# Altium PCB RLC_PCB.PcbDoc
Units mm, origin at the board's own origin, x right, y up, seen from the top; angles counter-clockwise.
Board outline 80 x 55 mm, 2 copper layers (Top Layer, Bottom Layer); 26 components, 16 nets, 138 pads, 207 vias.
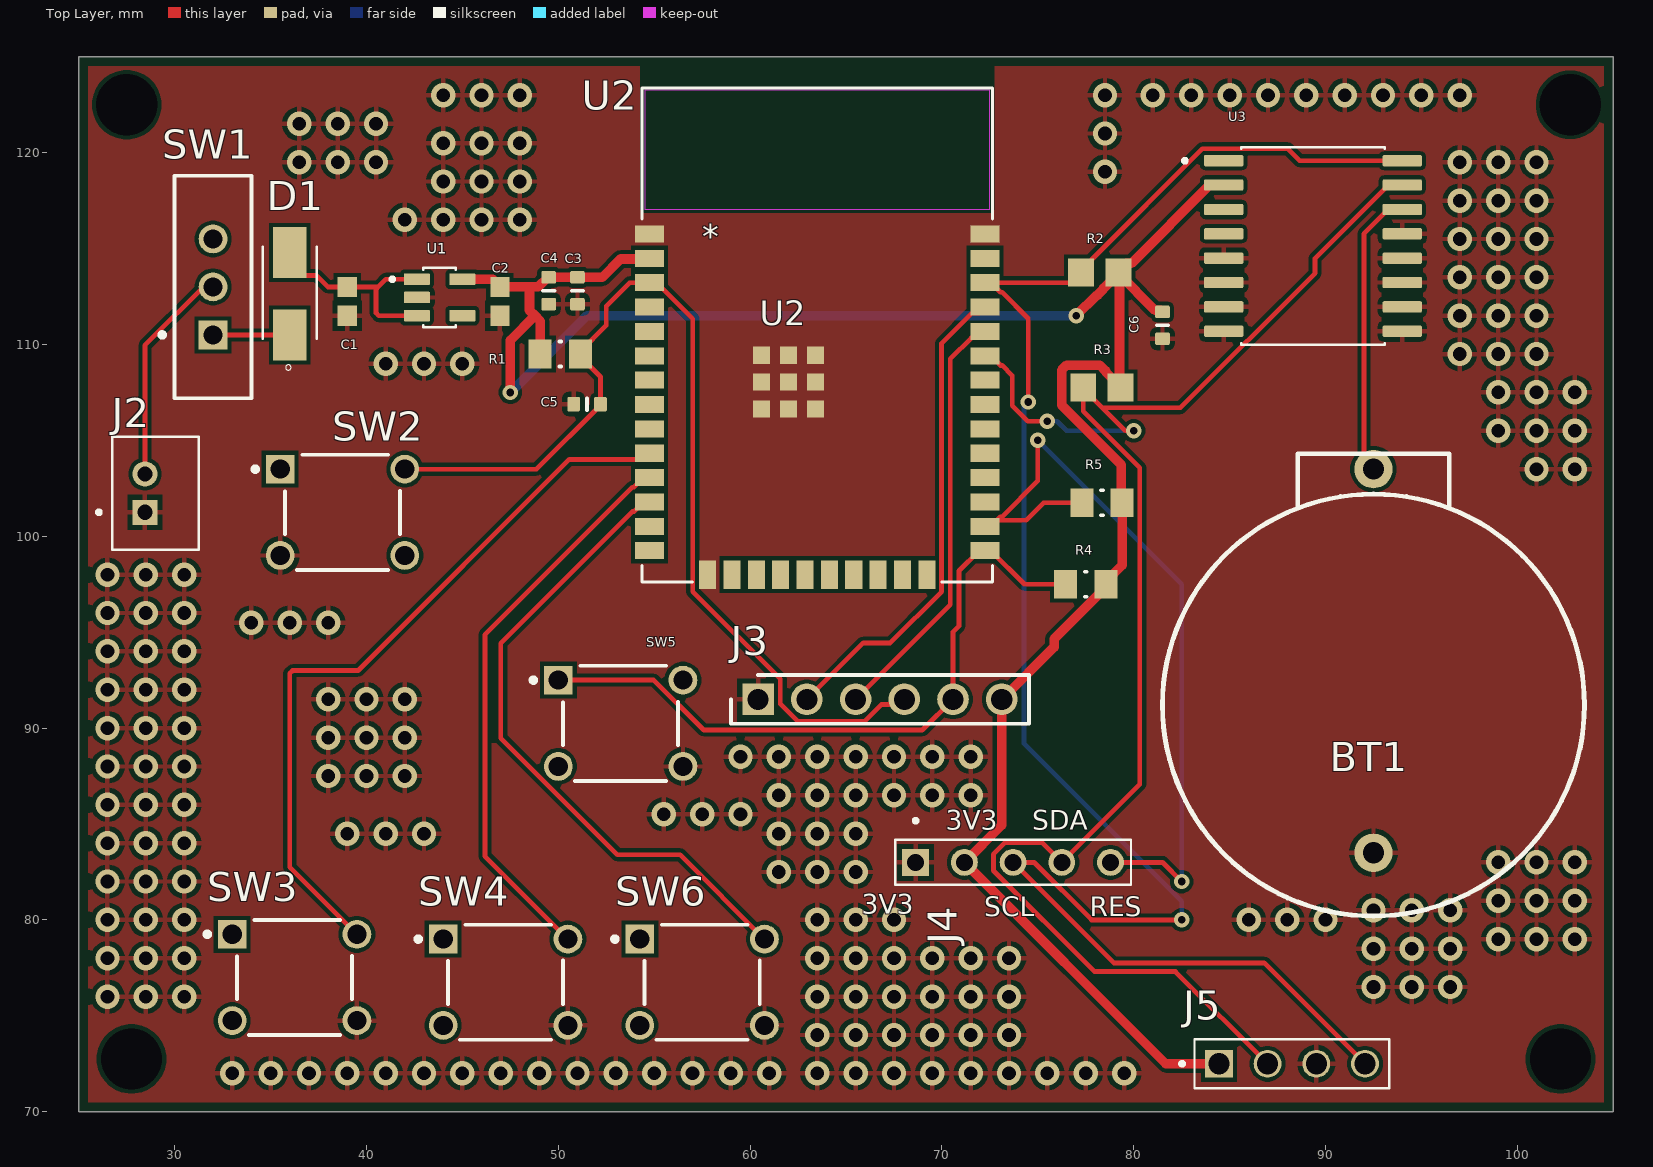
[diagram p0: Top Layer view]
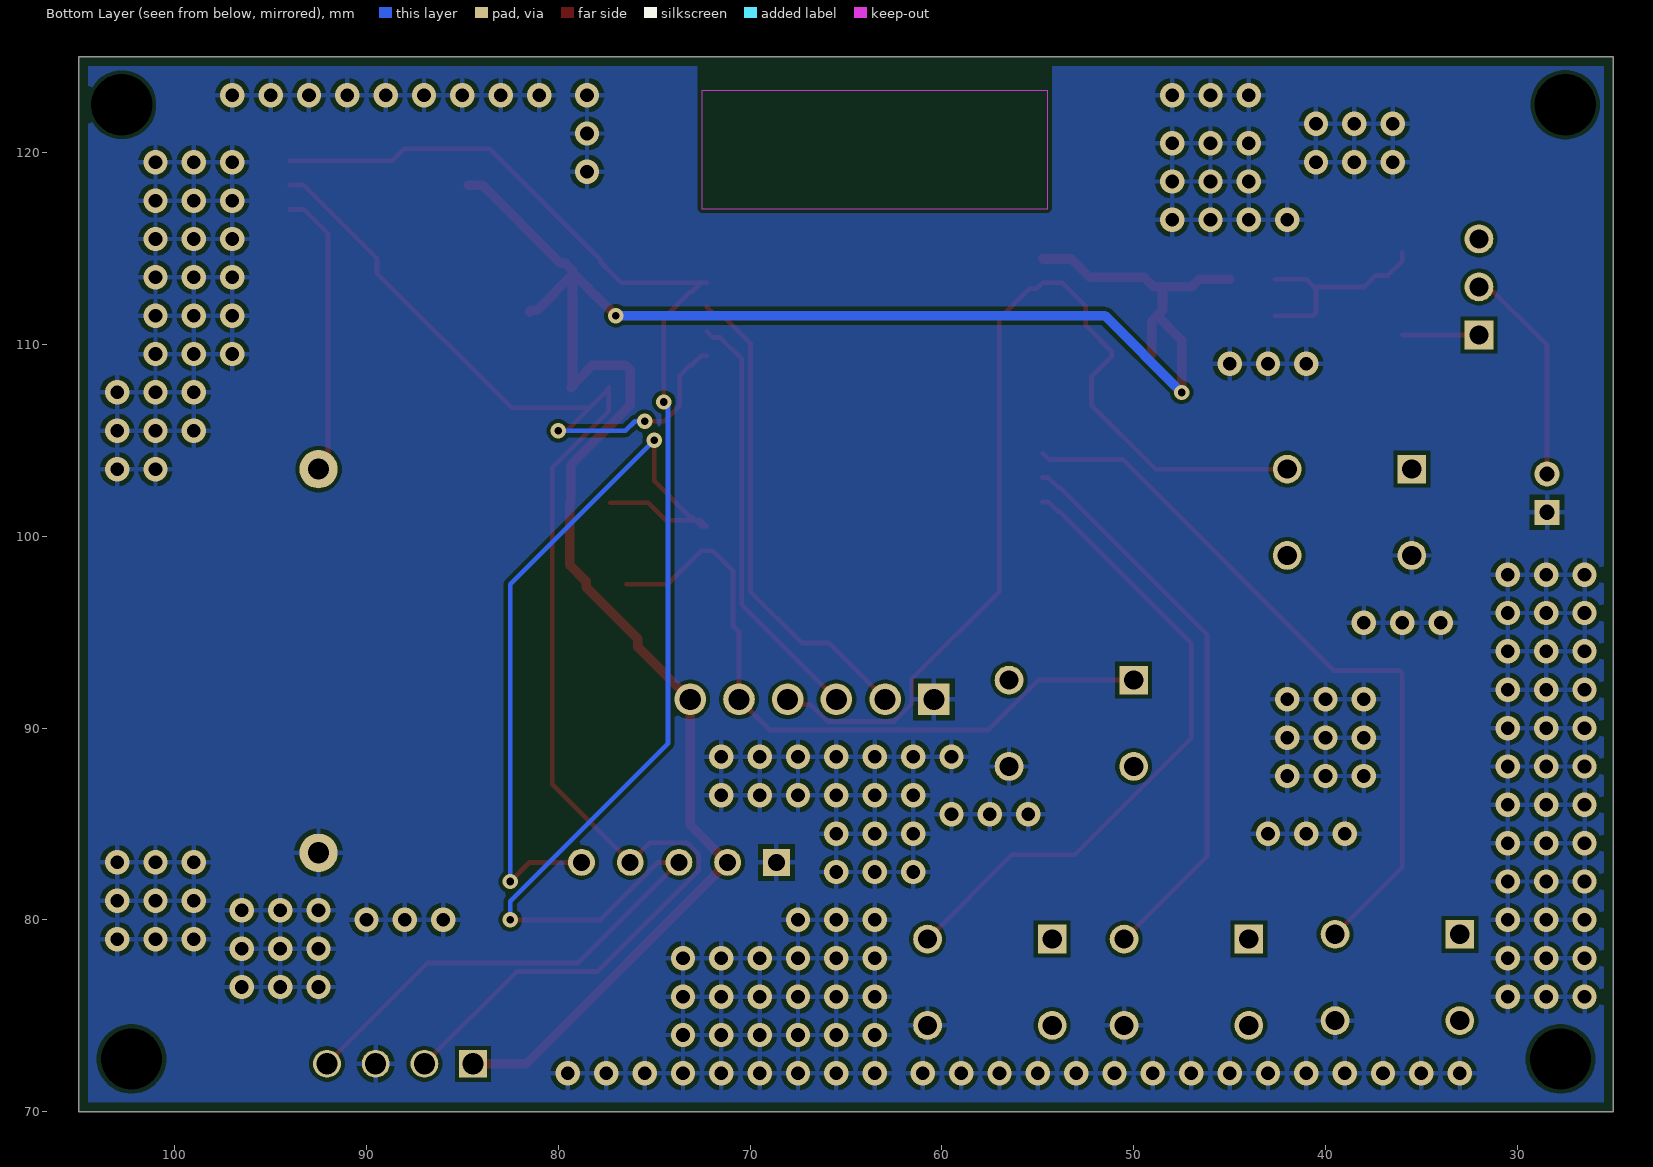
[diagram p1: Bottom Layer view, seen from below]
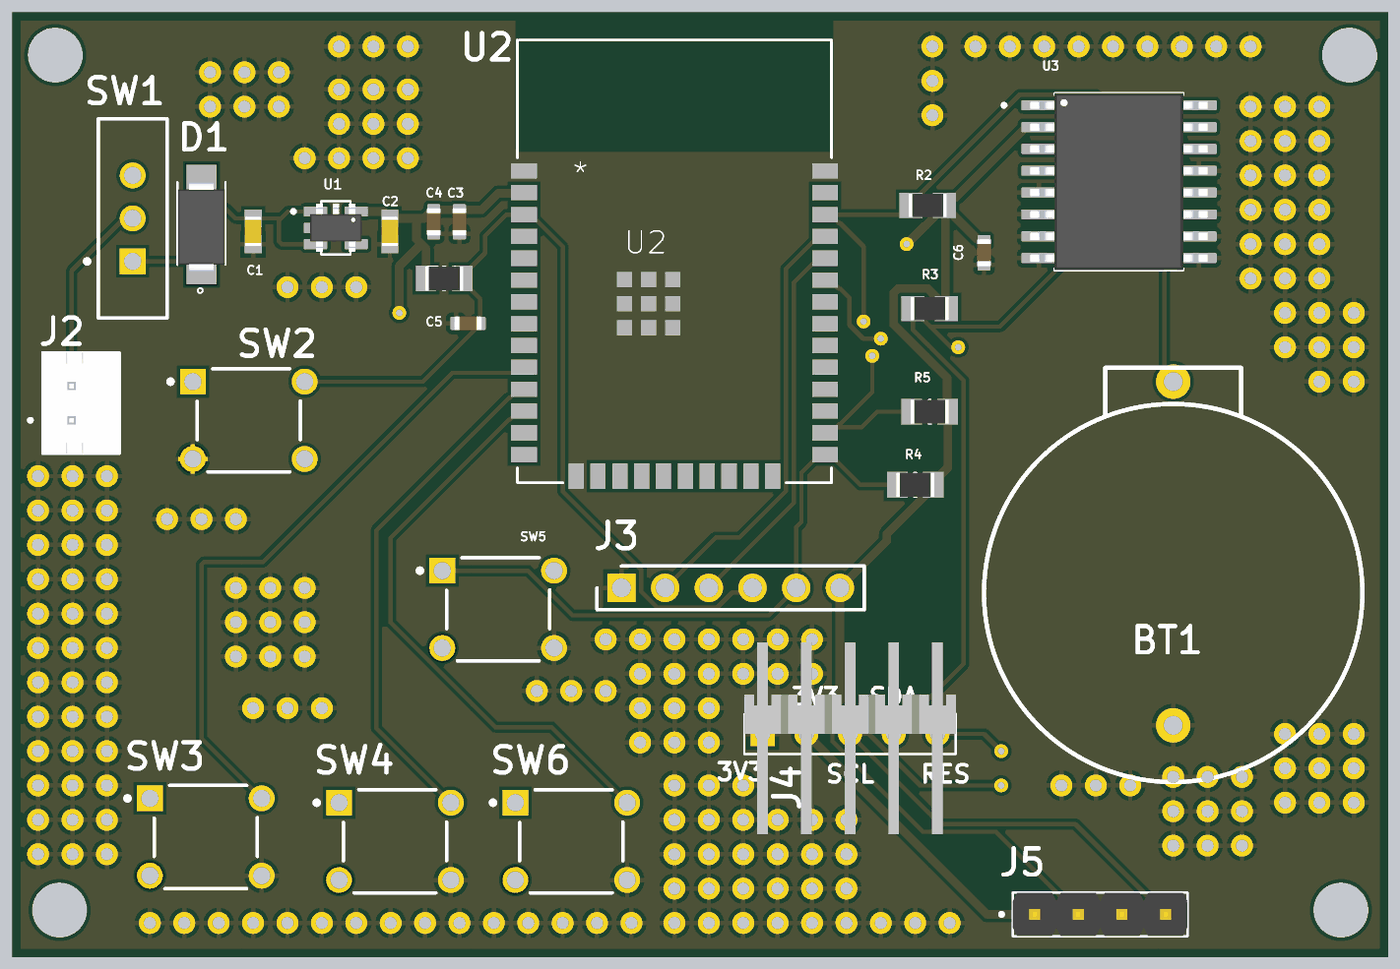
[diagram p2: 3D render of the assembled board from above, using the file's embedded part models]

## Layer stack, top to bottom
Top Solder: solder mask 0.0102, Solder Resist, Dk 3.5
Top Layer: signal copper 0.0356
Dielectric 1: dielectric 0.32, FR-4, Dk 4.8
Bottom Layer: signal copper 0.0356
Bottom Solder: solder mask 0.0102, Solder Resist, Dk 3.5

## Board outline
25,70 25,125 105,125 105,70

## Design rules (kind name [scope] priority, off if disabled: settings)
BoardOutlineClearance [All] p1: gap=0.4 ignorepadtopadclearanceinfootprint=FALSE
Clearance [All] p1: gap=0.2 ignorepadtopadclearanceinfootprint=FALSE
HoleSize [All] p1: absolutevalues=TRUE maxlimit=6 minlimit=0.3 maxpercent=80.000 minpercent=20.000
HoleToHoleClearance [All] p1: gap=0.5 allowstackedmicrovias=TRUE
MinimumAnnularRing [All] p1: minimumring=0.15
PolygonConnect Direct_U2 [InComponent('U2')] p1: thpad.connectstyle=Direct thpad.reliefconductorwidth=0.254 thpad.reliefentries=4 thpad.polygonreliefangle="90 Angle" thpad.airgapwidth=0.254 smdpad.connectstyle=Direct smdpad.reliefconductorwidth=0.254 smdpad.reliefentries=4 smdpad.polygonreliefangle="90 Angle" smdpad.airgapwidth=0.254 via.connectstyle=Relief via.reliefconductorwidth=0.254 via.reliefentries=4 via.polygonreliefangle="90 Angle" via.airgapwidth=0.254
PolygonConnect [All] p2: connectstyle=Relief reliefconductorwidth=0.254 reliefentries=4 polygonreliefangle="90 Angle" airgapwidth=0.254
RoutingVias [All] p1: holewidth=0.711 width=1.27 viastyle="Through Hole" minholewidth=0.3 minwidth=0.6 maxholewidth=0.4 maxwidth=0.8
SilkToSolderMaskClearance [IsPad] p1: minsilkscreentomaskgap=0.15 clearancetoexposedcopper=TRUE
SolderMaskExpansion [All] p1: expansion=0 istentingtop=FALSE
SupplyNets "Schematic Supply Nets" [InNet('GND')] p1: voltage=0.000
Width Width_Power [InNet('3V3')] p1: maxlimit=1 minlimit=0.4 preferedwidth=0.5
Width [All] p2: maxlimit=1 minlimit=0.2 preferedwidth=0.25
27 further rules are at their usual default settings.

## Components (designator, comment, footprint, x,y, rotation, side; value= is the part's Value field where it differs from the comment)
BT1 "2032" PCBCOMPONENT_1 92.5,93.5 r90 top
C1 "Capacitor 1 uF +/- 10% 16 V 0603" CAPC1608X94X35NL15T15 39,112.25 r270 top value=1µF
C2 "Capacitor 1 uF +/- 10% 16 V 0603" CAPC1608X94X35NL15T15 46.954,112.25 r270 top value=1µF
C3 "Capacitor 10µF +/-20% 10V 0603" CAPC0603(1608)100_L 51,112.8 r270 top value=10µF
C4 "Capacitor 100nF +/-20% 10V 0603" CAPC0603(1608)100_L 49.5,112.8 r270 top value=100nF
C5 "Capacitor 10µF +/-20% 10V 0603" CAPC0603(1608)100_L 51.5,106.891 r0 top value=1µF
C6 "Capacitor 10µF +/-20% 10V 0603" CAPC0603(1608)100_L 81.5,111 r90 top value=100nF
D1 "SS14" SMA 36,112.5 r90 top
J2 "B2B-PH-K-S" JST_B2B-PH-K-S 29,102.25 r270 top
J3 "PRPC006SAAN-RC" HDRV6W64P0X254_1X6_1524X254X834P 60.42,91.5 r0 top
J4 "5-146280-5" TE_5-146280-5 73.71,83 r0 top
J5 "header 4" WURTH_61300411121 88.25,72.5 r0 top
R1 "Resistor 10k +/-1% 0805 125 mW" RESC2013X50X35ML15T15 50.109,109.5 r0 top value=10k
R2 "Resistor 4k7 +/-1% 0805 125 mW" RESC2013X70X40ML20T20 78.225,113.75 r0 top value=4.7k
R3 "Resistor 4k7 +/-1% 0805 125 mW" RESC2013X70X40ML20T20 78.342,107.75 r0 top value=4.7k
R4 "Resistor 10k +/-1% 0805 125 mW" RESC2013X50X35ML15T15 77.5,97.5 r0 top value=10k
R5 "Resistor 10k +/-1% 0805 125 mW" RESC2013X50X35ML15T15 78.342,101.75 r180 top value=10k
SW1 "EG1218" ESWI-EG1218_V 32,113 r90 top
SW2 "B3F-1000" OMRON-B3F-1000-4_V 38.75,101.25 r0 top
SW3 "B3F-1000" OMRON-B3F-1000-4_V 36.25,77 r0 top
SW4 "B3F-1000" OMRON-B3F-1000-4_V 47.25,76.75 r0 top
SW5 "B3F-1000" OMRON-B3F-1000-4_V 53.25,90.25 r0 top
SW6 "B3F-1000" OMRON-B3F-1000-4_V 57.5,76.75 r0 top
U1 "AP2112K-3.3TRG1" SOT95P285X140-5N 43.815,112.45 r0 top
U2 "ESP32-WROOM-32E-N4" ESP32­WROOM­32E_EXP 63.5,110.5 r0 top
U3 "DS3231SN_" SOIC127P1032X265-16N 89.345,115.135 r0 top

## Footprints (in the part's own frame and the unit in brackets; to place one, negate y for a bottom-side part, rotate by r counter-clockwise, add the part's x,y. Pads: shape width x height; smd on the part's side, far side on the other; paste and mask are expansions set on the pad)
CAPC0603(1608)100_L [mm] "Chip Capacitor, Body 1.6x0.8mm, Height 1.0mm, IPC High Density"
  rrect25% 0.66x0.76 smd: 1(-0.7,0) 2(0.7,0)
  silkscreen extent 0,-0.3 0,0.3, body extent -0.8,-0.4 0.8,0.4, height 0.95
CAPC1608X94X35NL15T15 [mm] "Chip Capacitor, 2-Leads, Body 1.75x0.96mm, IPC Medium Density"
  rect 1.05x1 smd: 1(-0.75,0) 2(0.75,0)
  body extent -0.87,-0.48 0.87,0.48, height 0.94
ESP32­WROOM­32E_EXP [mil]
  rect 59x35 smd paste+0 mask+0: 1(-344.5,207.1) 2(-344.5,157.1) 3(-344.5,107.1) 4(-344.5,57.1) 5(-344.5,7.1) 6(-344.5,-42.9) 7(-344.5,-92.9) 8(-344.5,-142.9) 9(-344.5,-192.9) 10(-344.5,-242.9) 11(-344.5,-292.9) 12(-344.5,-342.9) 13(-344.5,-392.9) 14(-344.5,-442.9) 25(344.5,-442.9) 26(344.5,-392.9) 27(344.5,-342.9) 28(344.5,-292.9) 29(344.5,-242.9) 30(344.5,-192.9) 31(344.5,-142.9) 32(344.5,-92.9) 33(344.5,-42.9) 34(344.5,7.1) 35(344.5,57.1) 36(344.5,107.1) 37(344.5,157.1) 38(344.5,207.1)
  rect 35x59 smd paste+0 mask+0: 15(-225,-492.15) 16(-175,-492.15) 17(-125,-492.15) 18(-75,-492.15) 19(-25,-492.15) 20(25,-492.15) 21(75,-492.15) 22(125,-492.15) 23(175,-492.15) 24(225,-492.15)
  rect 35x35 smd paste+0 mask+0: 39(-59.1,-96.9) 40(-114.2,-41.8) 41(-114.2,-96.9) 42(-114.2,-152) 43(-59.1,-152) 44(-4,-152) 45(-4,-96.9) 46(-4,-41.8) 47(-59.1,-41.8)
  Keep-Out Layer region: 354.5,258 354.5,502 -354.5,502 -354.5,258
  silkscreen extent -360,-507 360,507
ESWI-EG1218_V [mm] "THD, 3-Leads, Body 11.6x4mm, Pitch 2.5mm"
  rect 1.5x1.5 hole 1: 1(-2.5,0)
  round 1.5 hole 1: 2(0,0) 3(2.5,0)
  silkscreen extent -5.8,-2 5.8,2.77, body extent -5.8,-2 5.8,2, height 7.4
HDRV6W64P0X254_1X6_1524X254X834P [mm]
  rect 1.65x1.65 / inner round 1.65 / far side rect 1.65x1.65 hole 1.1: 1(0,0)
  round 1.65 hole 1.1: 2(2.54,0) 3(5.08,0) 4(7.62,0) 5(10.16,0) 6(12.7,0)
  silkscreen extent -1.42,-1.27 14.12,1.27
JST_B2B-PH-K-S [mm]
  rect 1.308x1.308 / inner round 1.308 / far side rect 1.308x1.308 hole 0.8: 1(1,-0.55)
  round 1.308 hole 0.8: 2(-1,-0.55)
  silkscreen extent -2.95,-3.05 2.95,2.25, body extent -2.95,-2.25 2.95,2.25, height 6
OMRON-B3F-1000-4_V [mm] "TH, 4-Leads, Body 6x6mm"
  rect 1.5x1.5 hole 1 paste-2539.97: 1(-3.25,2.25)
  round 1.5 hole 1 paste-2539.97: 2(3.25,2.25) 4(3.25,-2.25)
  round 1.5 hole 1 paste-2539.97 mask+0.102: 3(-3.25,-2.25)
  silkscreen extent -4.67,-3 3,3, body extent -3.4,-3 3.4,3, height 4.5
PCBCOMPONENT_1 [mm]
  round 2 hole 1.1: 1(10,0) 2(-10,0)
  silkscreen extent -13.3,-11 10.8,11
RESC2013X50X35ML15T15 [mm] "Chip Resistor, 2-Leads, Body 2.2x1.4mm, IPC Low Density"
  rect 1.2x1.5 smd: 1(-1.05,0) 2(1.05,0)
  silkscreen extent -0.05,-0.65 0.05,0.65, body extent -1.1,-0.7 1.1,0.7, height 0.5
RESC2013X70X40ML20T20 [mm] "Chip Resistor, 2-Leads, Body 2.2x1.35mm, IPC Low Density"
  rect 1.35x1.45 smd: 1(-0.975,0) 2(0.975,0)
  body extent -1.1,-0.67 1.1,0.67, height 0.7
SMA [mm]
  rect 2.65x1.75 smd paste+0 mask+0.102: P1(-2,0) P2(2.3,0)
  silkscreen extent -3.84,-1.4 2.6,1.4, body extent -2.6,-1.36 2.6,1.36, height 2.5
SOIC127P1032X265-16N [mm]
  rrect25% 2.05x0.59 smd: 1(-4.655,4.445) 2(-4.655,3.175) 3(-4.655,1.905) 4(-4.655,0.635) 5(-4.655,-0.635) 6(-4.655,-1.905) 7(-4.655,-3.175) 8(-4.655,-4.445) 9(4.655,-4.445) 10(4.655,-3.175) 11(4.655,-1.905) 12(4.655,-0.635) 13(4.655,0.635) 14(4.655,1.905) 15(4.655,3.175) 16(4.655,4.445)
  silkscreen extent -6.78,-5.15 3.75,5.15, body extent -5.16,-5.15 5.16,5.15, height 2.65
SOT95P285X140-5N [mm]
  rrect15% 1.35x0.6 smd: 1(-1.185,0.95) 2(-1.185,0) 3(-1.185,-0.95) 4(1.185,-0.95) 5(1.185,0.95)
  silkscreen extent -2.57,-1.55 0.85,1.55, body extent -1.5,-1.4 1.5,1.4, height 1.4
TE_5-146280-5 [mm]
  rect 1.398x1.398 / inner round 1.398 / far side rect 1.398x1.398 hole 0.89: 1(-5.08,0)
  round 1.398 hole 0.89: 2(-2.54,0) 3(0,0) 4(2.54,0) 5(5.08,0)
  silkscreen extent -6.15,-1.17 6.15,2.27, body extent -6.15,-5.84 6.15,5.33, height 1.17
WURTH_61300411121 [mm]
  rect 1.45x1.45 / inner round 1.45 / far side rect 1.45x1.45 hole 1.1: 01(-3.81,0)
  round 1.45 hole 1.1: 02(-1.27,0) 03(1.27,0) 04(3.81,0)
  silkscreen extent -5.83,-1.27 5.08,1.27, body extent -5.08,-1.27 5.08,1.27, height 7.27

## Part data
BT1: library part Component_1
C1 C2: library part CMP-001-00003-6, "Chip Capacitor, 1 uF, +/- 10%, 16 V, 0603 (1608 Metric)", Capacitor Type=Ceramic, Case/Package=0603, Max Operating Temperature=125°C, Min Operating Temperature=-55°C, Tolerance=10%, Voltage Rating=16V, Mounting Technology=SM, Pins=2, RoHS Compliant=True
C3 C5 C6: library part CMP-001-00075-4, "Chip Capacitor, 10µF +/-20%, 10V, 0603, Thickness 1 mm", Case/Package=0603, Max Operating Temperature=85°C, Min Operating Temperature=-55°C, Tolerance=10%, Voltage Rating=10V, Mounting Technology=SMT, Pins=2
C4: library part CMP-001-00075-4, Case/Package=0603, Max Operating Temperature=85°C, Min Operating Temperature=-55°C, Tolerance=10%, Voltage Rating=10V, Mounting Technology=SMT, Pins=2
D1: library part CMP-004-00031-1, "Diode Schottky 40 V 1A Surface Mount DO-214AC (SMA)", Case/Package="SMA-2 ON Semiconductor", Check_prices=https://www.snapeda.com/parts/SS14/Onsemi/view-part/?ref=eda, Component Type=Standard, Design Item ID=SS14, MF=ON, MP=SS14, Pins=2, SnapEDA_Link=https://www.snapeda.com/parts/SS14/Onsemi/view-part/?ref=snap, Source=SS14.SchLib
J2: library part CMP-002-00073-1, "Connector Header Through Hole 2 position 0.079 (2.00mm)", Case/Package=None, Check_prices=https://www.snapeda.com/parts/B2B-PH-K-S/JST/view-part/?ref=eda, Component Type=Standard, Design Item ID=B2B-PH-K-S, MF="JST Sales America Inc.", MP=B2B-PH-K-S, Pins=2, SnapEDA_Link=https://www.snapeda.com/parts/B2B-PH-K-S/JST/view-part/?ref=snap, Source=B2B-PH-K-S.SchLib
J3: library part CMP-002-00074-1, "CONN HEADER VERT 6POS 2.54MM", Manufacturer_Name=Sullins, Datasheet Link=https://media.digikey.com/PDF/Data%20Sheets/Sullins%20PDFs/xRxCzzzSxxN-RC_ST_11635-B.pdf, Design Item ID=PRPC006SAAN-RC, Geometry.Height=8.34mm, Manufacturer_Part_Number=PRPC006SAAN-RC, Source=PRPC006SAAN-RC.SchLib
J4: library part CMP-031-000000-1, "05 MODII HDR SRST B/A .100CL", Package=None, Availability=Unavailable, Component Type=Standard, Design Item ID=5-146280-5, MP=5-146280-5, Pin Count=5, Price=None, Source=5-146280-5.SchLib
J5: library part CMP-002-00076-1, "Connector Header Through Hole 4 position 0.100 (2.54mm)", Case/Package=None, Check_prices=https://www.snapeda.com/parts/61300411121/W%25C3%25BCrth+Elektronik+Midcom/view-part/?ref=eda, Component Type=Standard, Design Item ID=61300411121, MF="WÃ¼rth Elektronik", MP=61300411121, Pins=4, SnapEDA_Link=https://www.snapeda.com/parts/61300411121/W%25C3%25BCrth+Elektronik+Midcom/view-part/?ref=snap, Source=61300411121.SchLib
R1 R4 R5: library part CMP-009-00018-5, "Chip Resistor, 10 KOhm, +/- 1%, 125 mW, -55 to 155 degC, 0805 (2012 Metric)", Case/Package=0805, Max Operating Temperature=155°C, Min Operating Temperature=-55°C, Power=125mW, Tolerance=1%, Voltage Rating=150V, Mounting Technology=SM, Pins=2, RoHS Compliant=True
R2 R3: library part CMP-009-00032-5, "Chip Resistor, 4.7 KOhm, +/- 1%, 0.125 W, -55 to 155 degC, 0805 (2012 Metric)", Case/Package=0805, Max Operating Temperature=155°C, Min Operating Temperature=-55°C, Power=125mW, Tolerance=1%, Voltage Rating=150V, Mounting Technology=SM, Pins=2, RoHS Compliant=True
SW1: library part CMP-1696-00002-1, "Slide Switch, 500 V, -20 to 70 degC, 3-Pin THD, RoHS", Case\Package=SOT-23-5, Dropout Voltage="300 mV", Max Input Voltage="8 V", Max Operating Temperature="85 degC", Max Ouput Current="150 mA", Max Power Dissipation="250 mW", Min Input Voltage="4.3 V", Min Operating Temperature="-40 degC", Nominal Output Voltage="3.3 V", Package Quantity=3000, ComponentLink1Description="Manufacturer URL", ComponentLink1URL=http://www.e-switch.ch/en/, ComponentLink2Description=Datasheet, ComponentLink2URL=https://www.e-switch.com/system/asset/product_line/data_sheet/119/EG.pdf, DatasheetVersion=Oct-15, Height="1.3 mm", Length="3 mm", Mount="Surface Mount", Output Current="150 mA", Output Voltage="3.3 V", Outputs=1, PackageDescription="3-Pin Through Hole Device, Body 11.6 x 4 mm, Pitch 2.5 mm", PackageReference=EG1218, Packaging="Tape and Reel", Pins=5, Power Rating="250 mW", Radiation Hardening=No, REACH SVHC="No SVHC", RoHSCompliant=true, Width="1.8 mm"
SW2 SW3 SW4 SW5 SW6: library part CMP-011-00004-2, "Tactile Switch, SPST-NO, 0.05 A, 24 V, -25 to 70 degC, 4-Pin THD, RoHS, Bulk", Contact Current Rating=50mA, Manufacturer="Omron Electronic Components", Max Contact Resistance=100mohm, Max Operating Temperature=70°C, Max Voltage Rating (DC)=24V, Min Operating Temperature=-25°C, Operating Force=100gf, Package Description="4-Pin Through Hole Device, Body 6 x 6 mm", Package Quantity=1500, Resistance=0.1Ohm, Case/Package=B3F-1000, Contact Material=Gold, Contact Plating=Gold, Current Rating=50mA, Datasheet URL=http://www.omron.com/ecb/products/pdf/en-b3f.pdf, Datasheet Version=Jan-15, Manufacturer URL=http://www.omron.com/, Max Current Rating=50mA, Mounting Technology=TH, Package Reference=B3F-1000, Packaging=Bulk, Pins=4, RoHS Compliant=True, Throw Configuration=SPST, Voltage Rating=24V, Voltage Rating (DC)=24V
U1: library part CMP-031-00006-1, "Linear Voltage Regulator IC Positive Fixed 1 Output 600mA SOT-25", Case/Package="SOT-753 Diodes Inc.", Availability="In Stock", Check_prices=https://www.snapeda.com/parts/AP2112K-3.3TRG1/Diodes+Inc./view-part/?ref=eda, Component Type=Standard, Design Item ID=AP2112K-3.3TRG1, MF="Diodes Inc.", MP=AP2112K-3.3TRG1, Pins=4, Price=None, Purchase-URL=https://pricing.snapeda.com/search/part/AP2112K-3.3TRG1/?ref=eda, SnapEDA_Link=https://www.snapeda.com/parts/AP2112K-3.3TRG1/Diodes+Inc./view-part/?ref=snap, Source=AP2112K-3.3TRG1.SchLib
U2: library part CMP-017-000000-1, "Description", Manufacturer_Name="Espressif Systems", Copyright="Copyright (C) 2025 Ultra Librarian. All rights reserved.", Design Item ID=ESP32-WROOM-32E-N4, Manufacturer_Part_Number=ESP32-WROOM-32E-N4, RefDes=RefDes, Source=ESP32-WROOM-32E-N4.SchLib, Type=Type
U3: library part CMP-031-00007-1, "Real Time Clock (RTC) IC Clock/Calendar - IÂ²C, 2-Wire Serial 16-SOIC (0.295, 7.50mm Width)", Case/Package="SOIC-16 Maxim", Availability="In Stock", Check_prices=https://www.snapeda.com/parts/DS3231SN%23/Maxim+Integrated/view-part/?ref=eda, Component Type=Standard, Design Item ID=DS3231SN_, MF="Maxim Integrated", MP=DS3231SN#, Pins=16, Price=None, Purchase-URL=https://pricing.snapeda.com/search/part/DS3231SN#/?ref=eda, SnapEDA_Link=https://www.snapeda.com/parts/DS3231SN%23/Maxim+Integrated/view-part/?ref=snap, Source=DS3231SN_.SchLib

## Free pads (board coordinates)
  round 1.524 hole 3.2 unplated: 5(27.5,122.5) 5(27.75,72.75) 5(102.25,72.75) 5(102.75,122.5)

## Via types
v1: diameter 1.27, hole 0.711, Top Layer to Bottom Layer, 199 vias
v2: diameter 0.8, hole 0.4, Top Layer to Bottom Layer, 8 vias

## Nets (pads, with @x,y where several pads share a name; then routed paths per layer and width w, separated by ;. In a path a pad name is that pad's centre, name@x,y a point inside that pad or via, vN(x,y) a via of type N, cw(c..) or ccw(c..) an arc to the next point about the centre after c; other vN are vias at no path point)
3V3: C2.1 C3.1 C4.1 C6.2 J3.6 J4.2 J5.01 R1.1 R2.2 R3.2 R4.2 R5.1 U1.5 U2.2 U3.2 | length 121.3
  Top Layer w0.5: U1.5 46.579,113.4 46.954,113.025 C2.1 48.5,113 ; v2(47.5,107.5) 47.5,110.221 48.779,111.5 ; R1.1 49.059,111.221 48.779,111.5 ; U2.2 54.717,114.458 53.25,114.458 52.292,113.5 C3.1 C4.1 49.45,113.5 48.95,113 48.5,113 ; v2(77,111.5) 78.075,112.575 78.111,112.575 78.421,112.885 78.421,112.921 R2.2@79.2,113.7 ; R2.2 R2.2@79.2,113.7 ; R2.2@79.258,113.75 79.258,107.808 R3.2 79.317,107.8 78.538,108.579 78.538,108.615 78.228,108.925 76.505,108.925 76.242,108.661 76.242,106.839 79.354,103.726 79.354,101.788 R5.1 79.392,98.492 78.55,97.65 R4.2 78.55,97.35 75.848,94.648 75.848,94.228 J3.6 73.12,84.95 J4.2 81.67,72.5 J5.01 ; R2.2@79.258,113.858 79.625,114.225 79.875,114.225 83.96,118.31 U3.2 ; C6.2 81.42,111.78 81.12,111.78 R2.2@79.2,113.7 ; 48.5,113 48.5,111.779 48.779,111.5
  Bottom Layer w0.5: v2(47.5,107.5) 51.5,111.5 v2(77,111.5)
EN: C5.2 J3.4 R1.2 SW2.2 U2.3 | length 52.8
  Top Layer w0.25: SW2.2 48.858,103.5 52.2,106.842 C5.2 52.2,108.309 51.159,109.35 R1.2 51.159,109.65 52.5,110.991 52.5,112 53.72,113.22 U2.3 55.069,112.901 55.453,112.901 57.015,111.338 57.015,97.115 61.57,92.561 61.57,91.264 62.484,90.35 65.976,90.35 66.858,91.232 67.772,91.232 J3.4
GND: BT1.2 C1.2 C2.2 C3.2 C4.2 C5.1 C6.1 J2.1 J3.1 J4.1 J5.03 SW2.3 SW3.4 SW4.4 SW5.4 SW6.4 U1.2 U2.1 U2.15 U2.38 U2.39 U2.40 U2.41 U2.42 U2.43 U2.44 U2.45 U2.46 U2.47 U3.5 U3.6 U3.7 U3.8 U3.9 U3.10 U3.11 U3.12 U3.13
  other v1: 33,72 35,72 37,72 39,72 41,72 43,72 45,72 47,72 49,72 51,72 53,72 55,72 57,72 59,72 61,72 63.5,72 65.5,72 67.5,72 69.5,72 71.5,72 73.5,72 75.5,72 77.5,72 79.5,72 63.5,74 65.5,74 67.5,74 69.5,74 71.5,74 73.5,74 26.5,76 28.5,76 30.5,76 63.5,76 65.5,76 67.5,76 69.5,76 71.5,76 73.5,76 92.5,76.5 94.5,76.5 96.5,76.5 26.5,78 28.5,78 30.5,78 63.5,78 65.5,78 67.5,78 69.5,78 71.5,78 73.5,78 92.5,78.5 94.5,78.5 96.5,78.5 99,79 101,79 103,79 26.5,80 28.5,80 30.5,80 63.5,80 65.5,80 67.5,80 86,80 88,80 90,80 92.5,80.5 94.5,80.5 96.5,80.5 99,81 101,81 103,81 26.5,82 28.5,82 30.5,82 61.5,82.5 63.5,82.5 65.5,82.5 99,83 101,83 103,83 26.5,84 28.5,84 30.5,84 39,84.5 41,84.5 43,84.5 61.5,84.5 63.5,84.5 65.5,84.5 55.5,85.5 57.5,85.5 59.5,85.5 26.5,86 28.5,86 30.5,86 61.5,86.5 63.5,86.5 65.5,86.5 67.5,86.5 69.5,86.5 71.5,86.5 38,87.5 40,87.5 42,87.5 26.5,88 28.5,88 30.5,88 59.5,88.5 61.5,88.5 63.5,88.5 65.5,88.5 67.5,88.5 69.5,88.5 71.5,88.5 38,89.5 40,89.5 42,89.5 26.5,90 28.5,90 30.5,90 38,91.5 40,91.5 42,91.5 26.5,92 28.5,92 30.5,92 26.5,94 28.5,94 30.5,94 34,95.5 36,95.5 38,95.5 26.5,96 28.5,96 30.5,96 26.5,98 28.5,98 30.5,98 101,103.5 103,103.5 99,105.5 101,105.5 103,105.5 99,107.5 101,107.5 103,107.5 41,109 43,109 45,109 97,109.5 99,109.5 101,109.5 97,111.5 99,111.5 101,111.5 97,113.5 99,113.5 101,113.5 97,115.5 99,115.5 101,115.5 42,116.5 44,116.5 46,116.5 48,116.5 97,117.5 99,117.5 101,117.5 44,118.5 46,118.5 48,118.5 78.5,119 36.5,119.5 38.5,119.5 40.5,119.5 97,119.5 99,119.5 101,119.5 44,120.5 46,120.5 48,120.5 78.5,121 36.5,121.5 38.5,121.5 40.5,121.5 44,123 46,123 48,123 78.5,123 81,123 83,123 85,123 87,123 89,123 91,123 93,123 95,123 97,123
IO0: J3.5 R4.1 SW5.1 U2.25 | length 35.9
  Top Layer w0.25: SW5.1 54.98,92.5 57.58,89.9 68.98,89.9 J3.5 70.58,95.016 70.884,95.32 70.884,98.189 71.945,99.25 U2.25 72.555,99.25 74.305,97.5 R4.1
NetBT1_1: BT1.1 U3.14 | length 14.8
  Top Layer w0.25: BT1.1@92,103.5 92,115.77 93.27,117.04 U3.14
NetC1_1: C1.1 D1.P2 U1.1 U1.3 | length 11.4
  Top Layer w0.25: D1.P2 36,114.35 36.75,113.6 37.387,113.6 37.988,113 C1.1 40.615,113 ; U1.3 40.646,111.5 40.5,111.646 40.5,112.885 40.615,113 ; U1.1 41.015,113.4 40.615,113
NetD1_P1: D1.P1 SW1.1 | length 4
  Top Layer w0.25: SW1.1 D1.P1
NetJ2_2: J2.2 SW1.2 | length 11.4
  Top Layer w0.25: J2.2 28.45,109.95 SW1.2@31.75,113.25
NetSW3_2: SW3.2 U2.10 | length 38.6
  Top Layer w0.25: SW3.2 36,82.75 36,92.854 36.146,93 39.557,93 50.568,104.011 54.43,104.011 U2.10
NetSW4_2: SW4.2 U2.11 | length 29.6
  Top Layer w0.25: SW4.2 46.175,83.325 46.175,94.869 53.866,102.56 53.944,102.56 54.445,103.06 U2.11
NetSW6_2: SW6.2 U2.12 | length 33.8
  Top Layer w0.25: U2.12 54.445,101.79 53.944,101.29 53.866,101.29 47,94.424 47,89.48 53.083,83.397 56.353,83.397 SW6.2
OLED_RES: J4.5 R5.2 U2.26 | length 41.6
  Top Layer w0.25: v2(75,105) 75,102.887 73.134,101.021 73.056,101.021 72.555,100.52 U2.26 72.57,100.84 74.391,100.84 75.301,101.75 R5.2 ; J4.5 81.5,83 v2(82.5,82)
  Bottom Layer w0.25: v2(75,105) 82.5,97.5 v2(82.5,82)
RXD0: J3.3 U2.34 | length 22.2
  Top Layer w0.25: J3.3 70.434,96.434 70.434,109.248 71.547,110.361 71.931,110.361 U2.34
SCL: J4.3 J5.04 R2.1 U2.36 U3.16 | length 95.6
  Top Layer w0.25: v2(74.5,107) 74.5,111.354 73.134,112.72 73.056,112.72 72.555,113.22 U2.36 76.72,113.22 R2.1 77.8,114.3 77.8,114.426 83.574,120.2 88.027,120.2 88.647,119.58 U3.16 ; v2(82.5,80) 77.802,80 74.802,83 J4.3 78.955,77.755 86.805,77.755 J5.04
  Bottom Layer w0.25: v2(74.5,107) 74.275,106.775 74.275,89.2 82.5,80.975 v2(82.5,80)
SDA: J4.4 J5.02 R3.1 U2.33 U3.15 | length 85.9
  Top Layer w0.25: U2.33 72.555,109.41 73.056,108.91 73.134,108.91 73.667,108.377 73.667,106.808 74.475,106 v2(75.5,106) ; R3.1 R3.1@77.367,107.7 ; 78.367,106.7 82.436,106.7 89.453,113.717 89.453,114.493 93.27,118.31 U3.15 ; v2(80,105.5) 79.567,105.5 R3.1@77.367,107.7 ; J5.02 82.175,77.305 77.957,77.305 72.686,82.576 72.686,83.424 73.286,84.024 75.226,84.024 J4.4 80.317,87.067 80.317,103.577 77.367,106.527 R3.1@77.367,107.7
  Bottom Layer w0.25: v2(75.5,106) 76,106 76.5,105.5 v2(80,105.5)
TXD0: J3.2 U2.35 | length 25.3
  Top Layer w0.25: J3.2 65.902,94.442 67.311,94.442 69.985,97.115 69.985,110.068 71.547,111.631 71.931,111.631 U2.35
pads on no net: SW1.3 SW2.1 SW2.4 SW3.1 SW3.3 SW4.1 SW4.3 SW5.2 SW5.3 SW6.1 SW6.3 U1.4 U2.4 U2.5 U2.6 U2.7 U2.8 U2.9 U2.13 U2.14 U2.16 U2.17 U2.18 U2.19 U2.20 U2.21 U2.22 U2.23 U2.24 U2.27 U2.28 U2.29 U2.30 U2.31 U2.32 U2.37 U3.1 U3.3 U3.4

## Polygon pours and split planes (outlines as drawn)
GND on Bottom Layer "GND_L02_P000" (solid, remove dead copper, pour order 0): 25.5,124.5 104.5,124.5 104.5,70.5 25.5,70.5
GND on Top Layer "GND_L01_P001" (solid, remove dead copper, pour order 1): 104.5,124.5 104.5,70.5 25.5,70.5 25.5,124.5

## Other copper
Top Layer:
  pour cut-out: 72.75,125 72.75,117 54.25,117 54.25,125
Bottom Layer:
  pour cut-out: 72.75,125 72.75,117 54.25,117 54.25,125

## Silkscreen, mask and mechanical layers (free items; w line width, h text height)
Top Overlay:
  text "3V3" at 70.2,84.7 h1
  text "SDA" at 74.7,84.7 h1
  text "3V3" at 65.827,80.327 h1
  text "SCL" at 72.2,80.2 h1
  text "RES" at 77.7,80.2 h1
Mechanical 1:
  lines w0.254: 25,70 25,125 45,125 85,125 105,125 105,70 25,70

## Text inside footprints (layer, text, board x,y; h text height)
U2: Top Overlay "*" at 57.5,115 h1.27; Top Assembly "*" at 55.816,115.125 h1.27